# EAGLE board PCB (EAGLE 9.7.0)
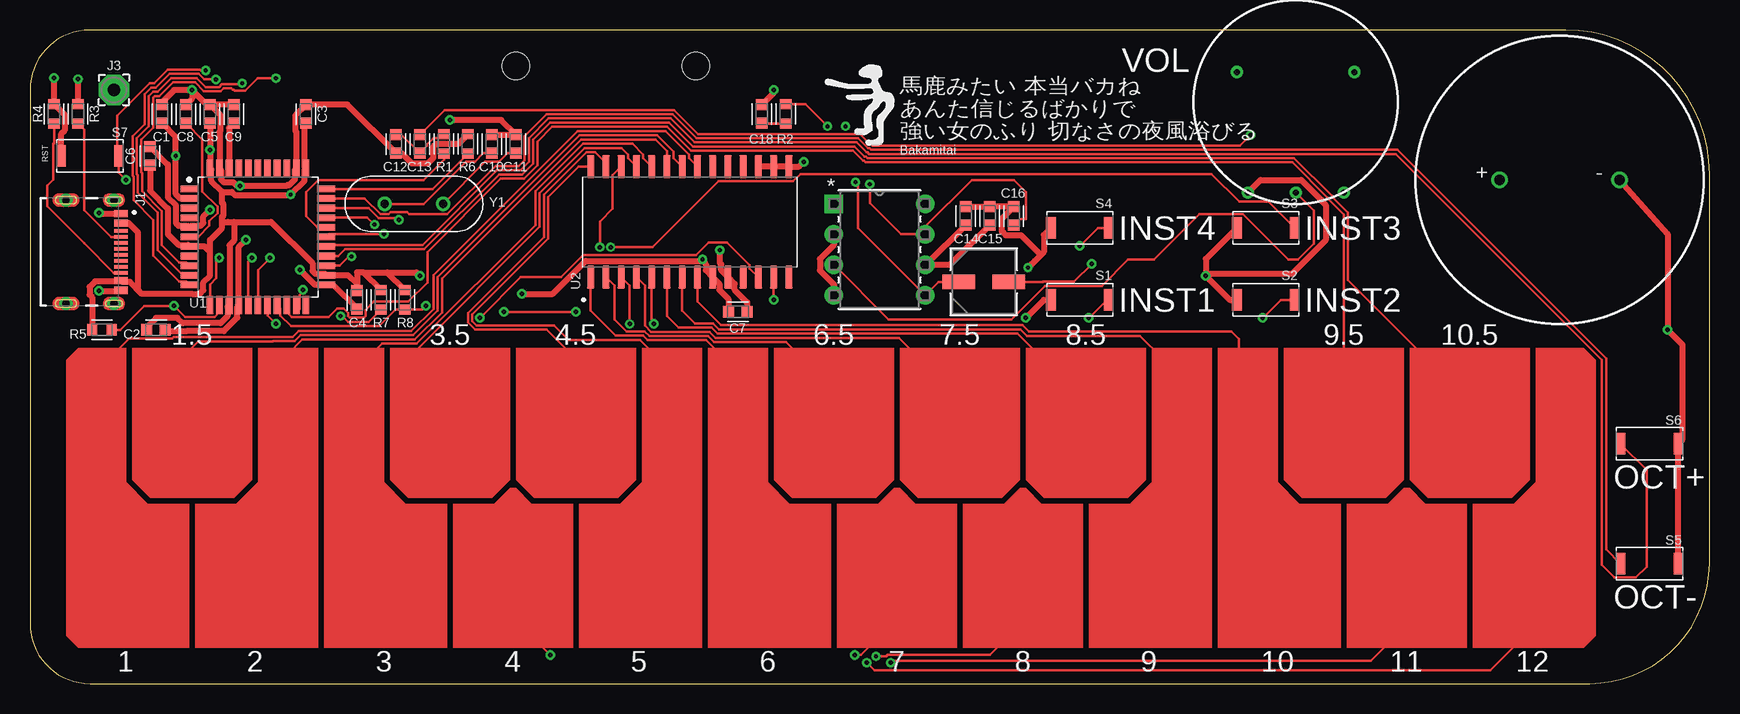
[diagram p0: board, top side]
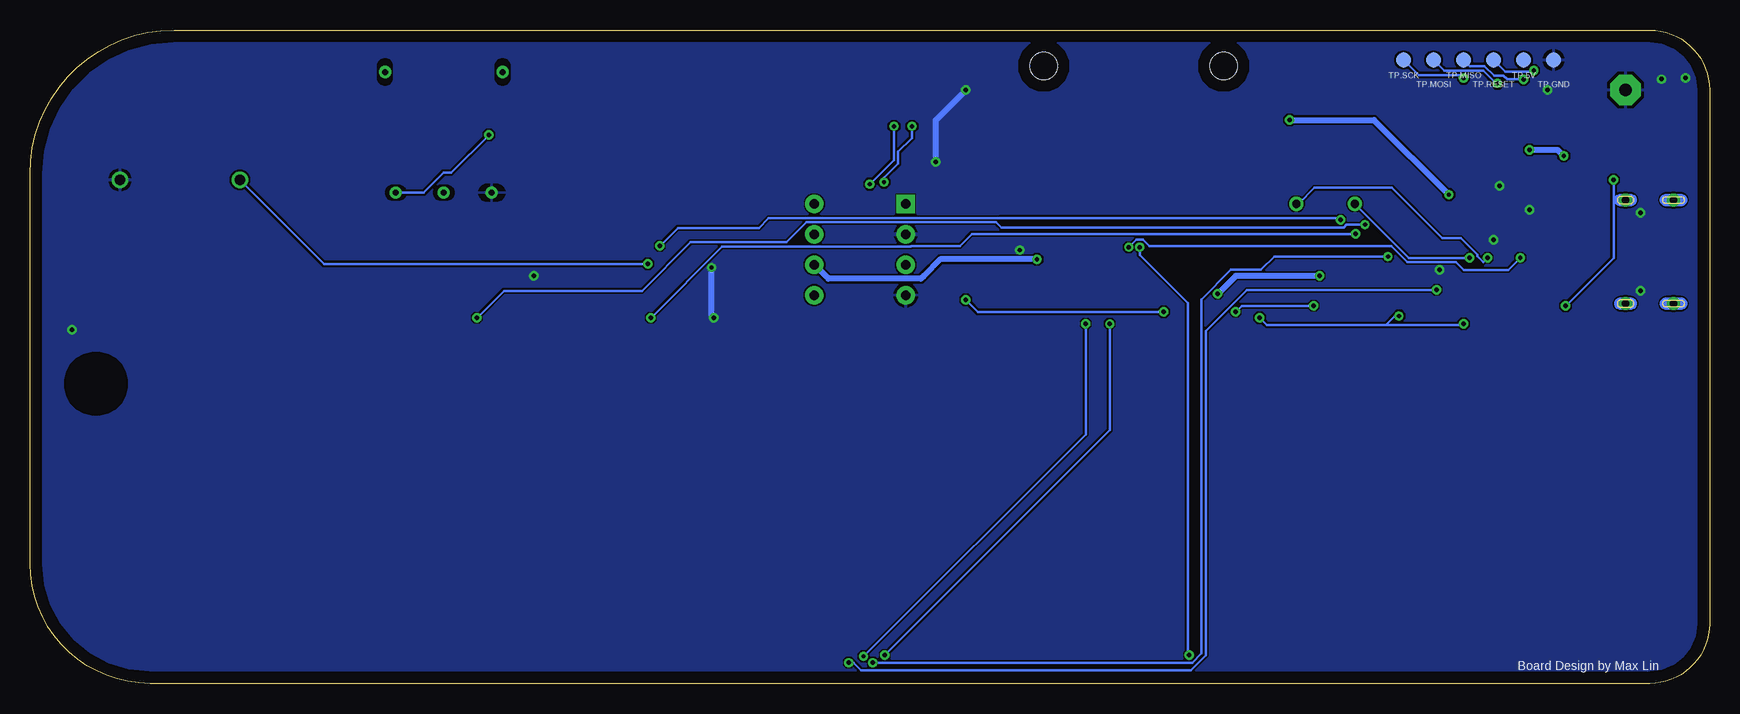
[diagram p1: board, bottom side, seen from below]

Size 140 x 54.5 mm. Coordinates in mm from the lower left corner, seen from the top.
Outline: 128,54.5 5,54.5 arc90 0,49.5 0,5 arc90 5,0 130,0 arc90 140,10 140,42.5 arc90 128,54.5
Copper layers (1*16): Top / Bottom
Stack-up Default Layer Stack: Top SilkScreen Epoxy Ink / Top SolderMask SR:Green 0.0254mm Dk 4.3 / Top Surface Finish Lead-Free 0.02mm / Top CuFoil:007 0.035mm / Dielectric-1 User Defined 1.5mm / Bottom CuFoil:007 0.035mm / Bottom Surface Finish Lead-Free 0.02mm / Bottom SolderMask SR:Green 0.0254mm Dk 4.3 / Bottom SilkScreen Epoxy Ink
Design rules: minimum copper width 6mil, minimum drill size 0.35mm, copper clearance wire_polygon to wire_polygon 6mil, copper clearance wire_polygon to pad_smd 6mil, copper clearance wire_polygon to via 6mil, copper clearance pad_smd to pad_smd 6mil, copper clearance pad_smd to via 6mil, copper clearance via to via 6mil, copper clearance smd to pad (same net) 6mil, copper clearance smd to via (same net) 6mil, copper clearance smd to smd (same net) 6mil, dimension clearance 40mil, via restrict clearance 0mil, restrict clearance 0mil, drill distance 6mil, keepout clearance 0mil
Holes 2.25 mm at 40.5,51.5 55.5,51.5

## Footprints (pad centres in the part's own frame; a part is rotated, then mirrored left to right if it is on the bottom)
CAPC1608X85 = smd 0.921 x 0.97: 1 -0.775,0; 2 0.775,0
CAP_UCD_5X5P8_NCH = smd 2.718 x 1.219: 1 -2.095,0; 2 2.095,0
GCT_USB4215-03-A_REVA = smd 0.6 x 1.15: A1_B12 -3.2,4.575; A4_B9 -2.4,4.575; B1_A12 3.2,4.575; B4_A9 2.4,4.575 | smd 0.3 x 1.15: A5 -1.25,4.575; A6 -0.25,4.575; A7 0.25,4.575; A8 1.25,4.575; B5 1.75,4.575; B6 0.75,4.575; B7 -0.75,4.575; B8 -1.75,4.575 | drill 0.6 pad 1: SH1 -4.32,4; SH2 4.32,4; SH3 -4.32,0; SH4 4.32,0
2.54/1.0 = drill 1.016 pad 2.54 octagon: 1 0,0
RESC1608X60 = smd 0.799 x 0.974: 1 -0.815,0; 2 0.815,0
B3U-1000P(M) = smd 0.8 x 1.8: 1 -2.4,0; 2 2.42,0
TP127R = smd 1.27 x 1.27: TP 0,0
QFP80P1200X1200X120-44 = smd 1.5 x 0.55: 1 -5.7,4; 2 -5.7,3.2; 3 -5.7,2.4; 4 -5.7,1.6; 5 -5.7,0.8; 6 -5.7,0; 7 -5.7,-0.8; 8 -5.7,-1.6; 9 -5.7,-2.4; 10 -5.7,-3.2; 11 -5.7,-4; 23 5.7,-4; 24 5.7,-3.2; 25 5.7,-2.4; 26 5.7,-1.6; 27 5.7,-0.8; 28 5.7,0; 29 5.7,0.8; 30 5.7,1.6; 31 5.7,2.4; 32 5.7,3.2; 33 5.7,4 | smd 0.55 x 1.5: 12 -4,-5.7; 13 -3.2,-5.7; 14 -2.4,-5.7; 15 -1.6,-5.7; 16 -0.8,-5.7; 17 0,-5.7; 18 0.8,-5.7; 19 1.6,-5.7; 20 2.4,-5.7; 21 3.2,-5.7; 22 4,-5.7; 34 4,5.7; 35 3.2,5.7; 36 2.4,5.7; 37 1.6,5.7; 38 0.8,5.7; 39 0,5.7; 40 -0.8,5.7; 41 -1.6,5.7; 42 -2.4,5.7; 43 -3.2,5.7; 44 -4,5.7
SOIC127P1030X265-28N = smd 1.9 x 0.6: 1 -4.605,8.255; 2 -4.605,6.985; 3 -4.605,5.715; 4 -4.605,4.445; 5 -4.605,3.175; 6 -4.605,1.905; 7 -4.605,0.635; 8 -4.605,-0.635; 9 -4.605,-1.905; 10 -4.605,-3.175; 11 -4.605,-4.445; 12 -4.605,-5.715; 13 -4.605,-6.985; 14 -4.605,-8.255; 15 4.605,-8.255; 16 4.605,-6.985; 17 4.605,-5.715; 18 4.605,-4.445; 19 4.605,-3.175; 20 4.605,-1.905; 21 4.605,-0.635; 22 4.605,0.635; 23 4.605,1.905; 24 4.605,3.175; 25 4.605,4.445; 26 4.605,5.715; 27 4.605,6.985; 28 4.605,8.255
N08E_TEX = drill 0.813 pad 1.524 square: 1 0,0 | drill 0.813 pad 1.524: 2 0,-2.54; 3 0,-5.08; 4 0,-7.62; 5 7.62,-7.62; 6 7.62,-5.08; 7 7.62,-2.54; 8 7.62,0
STYLOPHONEPCB = smd 0 x 0: P$1 5.375,3; P$2 10.5,20; P$3 16.125,3; P$4 26.875,3; P$5 32,20; P$6 37.625,3; P$7 42.5,20; P$8 48.375,3; P$9 59.125,3; P$10 64.5,20; P$11 69.875,3; P$12 74.5,20; P$13 80.625,3; P$14 85.5,20; P$15 91.375,3; P$16 102.125,3; P$17 106.5,20; P$18 112.875,3; P$19 123.625,3; P$20 117.5,20
2307 = drill 0.9: P$1 -5,0; P$2 5,0
POT3 = drill 0.5 slot 1.27: P$1 -4,-7.57 | drill 0.5 slot 1: P$2 0,-7.57; P$3 4,-7.57 | drill 0.5 slot 1.5 rotated 90: P$4 4.9,2.5; P$5 -4.9,2.5
XTAL_HC49P488W43L1150T466H350 = drill 0.68 pad 1.08: 1 -2.44,0; 2 2.44,0

## Placement (x,y rotation side)
C1  100n  [CAPC1608X85]  11,47.5 90 top
C2  100n  [CAPC1608X85]  10.5,29.5 0 top
C3  100n  [CAPC1608X85]  23,47.5 90 top
C4  100n  [CAPC1608X85]  27.25,32 270 top
C5  100n  [CAPC1608X85]  15,47.5 90 top
C6  10u  [CAPC1608X85]  10,44 90 top
C7  100n  [CAPC1608X85]  59,31 0 top
C8  1u  [CAPC1608X85]  13,47.5 90 top
C9  100n  [CAPC1608X85]  17,47.5 90 top
C10  22p  [CAPC1608X85]  38.5,45 90 top
C11  22p  [CAPC1608X85]  40.5,45 90 top
C12  10n  [CAPC1608X85]  30.5,45 90 top
C13  10u  [CAPC1608X85]  32.5,45 90 top
C14  100n  [CAPC1608X85]  78,39 270 top
C15  100u  [CAPC1608X85]  80,39 270 top
C16  10u  [CAPC1608X85]  82,39 90 top
C17  UCM0J221MCL1GSCAP_UCD_5X5P8_NCH  [CAP_UCD_5X5P8_NCH]  79.5,33.5 0 top
C18  47n  [CAPC1608X85]  61,47.5 90 top
J1  USB4215-03-A_REVAUSB4115-03-C_REVA  [GCT_USB4215-03-A_REVA]  3,36 270 top
J3  PAD  [2.54/1.0]  7,49.5 0 top
R1  1k  [RESC1608X60]  34.5,45 270 top
R2  10ohm  [RESC1608X60]  63,47.5 90 top
R3  5.1k  [RESC1608X60]  4,47.5 90 top
R4  5.1k  [RESC1608X60]  2,47.5 270 top
R5  10k  [RESC1608X60]  6,29.5 0 top
R6  10k  [RESC1608X60]  36.5,45 90 top
R7  4.7k  [RESC1608X60]  29.25,32 270 top
R8  4.7k  [RESC1608X60]  31.25,32 270 top
S1  B3U-X000B3U-1000P(M)1000P(M)  [B3U-1000P(M)]  87.5,32 0 top
S2  B3U-X000B3U-1000P(M)1000P(M)  [B3U-1000P(M)]  103,32 0 top
S3  B3U-X000B3U-1000P(M)1000P(M)  [B3U-1000P(M)]  103,38 0 top
S4  B3U-X000B3U-1000P(M)1000P(M)  [B3U-1000P(M)]  87.5,38 0 top
S5  B3U-X000B3U-1000P(M)1000P(M)  [B3U-1000P(M)]  135,10 180 top
S6  B3U-X000B3U-1000P(M)1000P(M)  [B3U-1000P(M)]  135,20 180 top
S7  B3U-X000B3U-1000P(M)1000P(M)  [B3U-1000P(M)]  5,44 180 top
TP.5V  TPTP127R  [TP127R]  15.5,52 180 bottom
TP.GND  TPTP127R  [TP127R]  13,52 180 bottom
TP.MISO  TPTP127R  [TP127R]  20.5,52 180 bottom
TP.MOSI  TPTP127R  [TP127R]  23,52 180 bottom
TP.RESET  TPTP127R  [TP127R]  18,52 180 bottom
TP.SCK  TPTP127R  [TP127R]  25.5,52 180 bottom
U1  ATMEGA32U4-AU  [QFP80P1200X1200X120-44]  19,37.25 0 top
U2  MCP23017-E/SO  [SOIC127P1030X265-28N]  55,38.5 90 top
U3  LM386N-1/NOPBN08E_TEX  [N08E_TEX]  67,40 0 top
U$1  STYLOPHONEPAD  [STYLOPHONEPCB]  3,3 0 top
U$2  23072307  [2307]  127.5,42 0 top
U$3  POT3POT3  [POT3]  105.51,48.5 0 top
Y1  HC-49/U-S16000000ABJB  [XTAL_HC49P488W43L1150T466H350]  32,40 0 top

## Library data of the parts
C1-C16 C18 = Capacitor; CATEGORY: Capacitor; PACKAGE_SIZE: 0603; PACKAGE_TYPE: Surface Mount; SUBCATEGORY: Ceramic Capacitors; TYPE: MLCC
C17 = 2026-10-24_01-56-39_Library; COPYRIGHT: Copyright (C) 2026 Ultra Librarian. All rights reserved.; MANUFACTURER_NAME: Nichicon; MANUFACTURER_PART_NUMBER: UCM0J221MCL1GS
J1 = USB4215-03-A_REVA; CREATOR: Amina; MANUFACTURER: Global Connector Technology; MAXIMUM_PACKAGE_HEIGHT: 3.16mm; PARTREV: A; STANDARD: Manufacturer Recommendations; VERIFIER: Your name, use the same always
J3 = Connector; CATEGORY: Connectors; DESCRIPTION: Pad with 2.54 mm diamater and 1mm drill; PACKAGE_SIZE: NA; PACKAGE_TYPE: Through Hole; PITCH: NA
R1-R8 = Resistor; CATEGORY: Resistors; DESCRIPTION: Chip Resistor 1.60 X 0.82 X 0.60 mm body 0603(1608-METRIC) Package; PACKAGE_SIZE: 0603; PACKAGE_TYPE: Surface Mount
S1-S7 = Switch; CATEGORY: Switches; DATASHEET: https://omronfs.omron.com/en_US/ecb/products/pdf/en-b3u.pdf; DESCRIPTION: Tactile Switch SPST-NO Top Actuated Surface Mount; MANUFACTURER: Omron Electronics Inc-EMC Div; MPN: B3U-1000PM; OPERATING_TEMPERATURE: -25°C ~ 70°C; PACKAGE_SIZE: NA; PACKAGE_TYPE: SMD; PART_STATUS: ACTIVE; ROHS: COMPLIANT; SERIES: B3U; SUBCATEGORY: Tactile Switches; TYPE: SPST-NO
TP.5V TP.GND TP.MISO TP.MOSI TP.RESET TP.SCK = PCB_Utilities; CATEGORY_L1: Test Points; DESCRIPTION: Test Point Round 1.27mmx1.27mm
U1 = IC_Embedded; CATEGORY: Embedded ICs; CORE: AVR; DATASHEET: https://ww1.microchip.com/downloads/en/DeviceDoc/Atmel-7766-8-bit-AVR-ATmega16U4-32U4_Datasheet.pdf; DESCRIPTION: AVR AVR® ATmega Microcontroller IC 8-Bit 16MHz 32KB (16K x 16) FLASH 44-TQFP (10x10); IO: 26; MANUFACTURER: Microchip Technology; MPN: ATmega32U4-AU; OPERATING_TEMPERATURE: -40°C ~ 85°C; PACKAGE_SIZE: 44-TQFP; PACKAGE_TYPE: Surface Mount; PART_STATUS: Active; ROHS: Compliant; SERIES: AVR® ATmega; SPEED: 16MHz; SUBCATEGORY: Microcontrollers; TYPE: 8-Bit
U2 = MCP23017-E_SO; AVAILABILITY: In Stock; CHECK_PRICES: https://www.snapeda.com/parts/MCP23017-E/SO/Microchip+Technology/view-part/?ref=eda; DESCRIPTION: I/O Port Expander, 16-Bit, I2C I'face, SOIC-28 | Microchip Technology Inc. MCP23017-E/SO; MF: Microchip; MP: MCP23017-E/SO; PACKAGE: SOIC-28 Microchip; PRICE: None; SNAPEDA_LINK: https://www.snapeda.com/parts/MCP23017-E/SO/Microchip+Technology/view-part/?ref=snap
U3 = 2026-10-22_22-21-42_Library; COPYRIGHT: Copyright (C) 2026 Ultra Librarian. All rights reserved.; DATASHEET: https://www.ti.com/lit/gpn/lm386; DESCRIPTION: 700-mW, mono, 5- to 18-V, analog input Class-AB audio amplifier 8-PDIP 0 to 70; MANUFACTURER_NAME: Texas Instruments; MANUFACTURER_PART_NUMBER: LM386N-1/NOPB
U$1 = Stylophone Pads
U$2 = 2307 Speaker
U$3 = POT3
Y1 = HC-49_U-S16000000ABJB; AVAILABILITY: In Stock; CHECK_PRICES: https://www.snapeda.com/parts/HC-49/U-S16000000ABJB/Citizen/view-part/?ref=eda; DESCRIPTION: 16 MHz ±30ppm Crystal 18pF 50 Ohms HC-49/US; MF: Citizen Finedevice; MP: HC-49/U-S16000000ABJB; PACKAGE: HC-49/US Citizen Finetech Miyota; PRICE: None; SNAPEDA_LINK: https://www.snapeda.com/parts/HC-49/U-S16000000ABJB/Citizen/view-part/?ref=snap

## Nets
5V: C1.1 C2.1 C3.1 C4.1 C5.1 C6.1 C7.1 C10.2 C11.2 C14.2 C15.2 J1.A4_B9 J1.B4_A9 R5.1 R7.1 R8.1 U1.2 U1.7 U1.14 U1.24 U1.34 U1.44 U2.9 U3.6
GND: C1.2 C2.2 C3.2 C4.2 C5.2 C6.2 C7.2 C8.2 C9.2 C12.1 C14.1 C15.1 C16.2 C18.2 J1.A1_B12 J1.B1_A12 J3.1 R3.2 R4.1 R6.2 S1.1 S2.1 S3.1 S4.1 S5.1 S6.1 S7.2 TP.GND.TP U1.5 U1.15 U1.23 U1.35 U1.43 U2.10 U2.15 U2.16 U2.17 U3.2 U3.4 U$2.P$2 U$3.P$1
N$1: R7.2 U1.18 U2.12
N$2: R8.2 U1.19 U2.13
N$3: U2.21 U$1.P$1
N$4: U2.22 U$1.P$2
N$5: U2.23 U$1.P$3
N$6: U2.24 U$1.P$4
N$7: U2.25 U$1.P$5
N$8: U2.26 U$1.P$6
N$9: U2.27 U$1.P$7
N$10: U2.28 U$1.P$8
N$11: U2.1 U$1.P$9
N$12: U2.2 U$1.P$10
N$13: U2.3 U$1.P$11
N$14: U2.4 U$1.P$12
N$15: U2.5 U$1.P$13
N$16: U2.6 U$1.P$14
N$17: U2.7 U$1.P$15
N$18: U2.8 U$1.P$16
N$19: U1.20 U$1.P$17
N$20: U1.21 U$1.P$18
N$21: U1.25 U$1.P$19
N$22: U1.26 U$1.P$20
N$23: S1.2 U1.28
N$24: S2.2 U1.30
N$25: S3.2 U1.12
N$26: S4.2 U1.31
N$27: S5.2 U1.32
N$28: S6.2 U1.27
N$29: C18.1 R2.1
N$30: R1.2 U1.29
N$31: C12.2 C13.1 R1.1
N$32: C13.2 U$3.P$3
N$33: U3.3 U$3.P$2
N$34: C16.1 U3.7
N$35: C9.1 U1.42
N$37: C11.1 U1.16 Y1.2
N$38: C17.1 R2.2 U3.5
N$39: J1.B5 R4.2
N$40: J1.A5 R3.1
N$41: C8.1 U1.6
N$42: R6.1 U1.33
N$43: TP.SCK.TP U1.9
N$44: TP.MOSI.TP U1.10
N$45: TP.MISO.TP U1.11
N$46: R5.2 S7.1 TP.RESET.TP U1.13
N$47: C10.1 U1.17 Y1.1
N$48: C17.2 U$2.P$1

## Tracks (layer width: path | path; a pad name or v marks a point on that pad's centre or on a via)
5V  (via drill 0.35)
  Top 0.5: R5.1 5.18,32.21 4.97,32.43 4.97,33.07 5.43,33.53 7.51,33.53 J1.B4_A9 7.67,33.5 8.32,33.5 9.32,32.5 | C3.1 22.88,46.6 22.88,43.07 U1.34 22.88,42.83 22.88,41.91 v21.73,40.77 21.69,40.72 17.11,40.72 16.83,41 16,41 | 27.25,33.29 27.25,34.29 27.77,34.29 27.78,34.28 | 27.25,33.29 C4.1 | 27.78,34.28 R7.1 | 27.78,34.28 29.78,34.28 | R8.1 29.78,34.28 | C5.1 v15,44.5 U1.44 15.12,42.83 15.12,41.91 16,41.03 16,41 | C7.1 58.23,32.07 57.47,32.82 57.47,33.33 U2.9 56.34,34.46 56.34,34.97 56.06,35.25 | 74.69,34.92 C14.2 | U3.6 74.69,34.92 | 74.69,34.92 75.19,34.92 76.69,34.92 77.19,35.42 C15.2 | C2.1 9.72,29.73 10.5,30.5 12.29,30.5 12.74,30.05 15.89,30.05 16.48,30.63 16.48,31.43 U1.14 16.62,31.57 16.62,36.55 17,36.92 17,38.5 | 27.25,33.29 26.49,34.05 U1.24 24.58,34.17 23.78,34.17 23.55,34.41 23.55,35.06 20.1,38.5 17,38.5 | C6.1 10,41.11 11.49,39.62 11.49,37.46 12.38,36.57 13.18,36.57 U1.7 14.55,36.45 15,36 | C1.1 12.15,45.58 12.15,45.5 v12.15,44 12.15,40.81 12.51,40.45 U1.2 | 9.32,32.5 13.5,32.5 14.14,32.5 14.45,32.81 14.45,33.45 15,34 15,36 | 15,36 15,37 16,38 16,38.5 | 16,38.5 16.5,38.5 17,38.5 | 16,38.5 16,38.9 16.13,39.03 16.13,39.97 16,40.1 16,41 | 29.78,34.28 32.22,34.28 v32.5,34 | 56.06,35.25 46.32,35.25 43.58,32.5 v41,32.5 | 56.06,35.25 v56.06,35.38 56.06,35.25 | C10.2 C11.2 39.27,47 v35,47 | 9.32,32.5 9,32.82 9,37 9,37.62 8.22,38.4 J1.A4_B9
  Bottom 0.5: v32.5,34 39.5,34 v41,32.5 | v56.06,35.38 64.12,35.38 65.5,34 65.74,33.76 73.46,33.76 U3.6 | v35,47 27.97,47 v21.73,40.77 | v12.15,44 12.65,44.5 v15,44.5
GND  (via drill 0.35)
  Top 0.5: J1.B1_A12 7.53,32.75 v5.75,32.75 | J1.A1_B12 5.8,39.2 v5.75,39.25 | v2,50.5 R4.1 2.89,47.43 2.89,46.12 2.58,45.81 S7.2 | S5.1 S6.1 137.77,20.37 137.77,28.23 v136.5,29.5 136.5,37.5 U$2.P$2 | C18.2 62,49.27 v62,49.5 | 66.54,37.46 U3.2 67,36.57 65.84,35.4 65.84,34.44 67,33.27 U3.4 | R3.2 v4,50.41 | v13.5,49.5 12,49.5 11,48.5 C1.2 | C4.2 27.25,31.26 25.26,33.25 U1.23 23.75,33.25 v22.5,34.5 | C5.2 15.89,47.39 15.89,46.1 15.8,46.01 U1.43 15.92,42.83 15.92,42.03 16.16,41.8 16.95,41.8 17.25,41.5 v17.5,41.5 21.36,41.5 21.41,41.55 21.59,41.55 22.08,42.03 22.08,42.83 U1.35 22.2,46.01 22.11,46.1 22.11,47.39 C3.2 26.45,48.27 C12.1 30.98,44.23 31.85,43.36 33.15,43.36 33.61,43.82 33.61,44.75 33.85,44.99 34.38,44.99 34.4,45 34.5,45 35.69,45 R6.2 | C7.2 59.77,31.79 58.74,32.82 58.74,33.33 U2.10 57.61,34.46 57.61,34.97 57.5,35.08 v57.5,36.16 | C15.1 80,40 | v13.5,49.5 13.5,48.77 C8.2 | C5.2 14.72,48.27 v13.5,49.5 | C2.2 11.38,29.39 13.06,29.39 16.16,29.39 17.28,30.51 17.28,31.43 U1.15 17.4,36.4 v18,37 | C6.2 11.49,43.28 11.49,40.54 12.15,39.89 12.15,38.41 12.38,38.17 13.18,38.17 U1.5 13.42,38.17 14.22,38.17 14.45,38.41 14.45,38.95 v15,39.5 | S4.1 84.5,37.4 84.5,36 84.25,35.75 | 84.25,35.75 83.75,35.25 83.5,35 v83.18,34.68 | S1.1 84.5,32 v83,30.5 | S3.1 98,35.4 98,34.15 | 98,34.15 v98,34 100,32 S2.1 | U$3.P$1 102.58,42 105.97,42 107.65,40.32 107.65,40.26 108,39.91 108,36.96 105.19,34.15 98,34.15 | U2.17 U2.16 U2.15 64.11,43.1 v64.5,43.5 | C9.2 C5.2 | 84.25,35.75 82.64,37.36 81.35,37.36 81,37.71 81,38.77 C16.2 C15.1 | C14.1 C15.1
  Bottom 0.5: v64.5,43.5 64.5,47 v62,49.5 | v83,30.5 83.18,30.68 v83.18,34.68
  pour Bottom: 0,54.5 140,54.5 140,0 0,0
N$1  (via drill 0.35)
  Top 0.2: v20.5,30 19.8,30.7 U1.18 | v37.5,30.5 40.9,33.9 44.26,33.9 46.11,35.75 55.54,35.75 56.58,36.79 58.12,36.79 60,34.91 60,34.61 U2.12 | v25.88,30.65 26.03,30.65 26.51,30.16 28.23,30.16 R7.2
  Bottom 0.2: 27,29.88 20.62,29.88 v20.5,30 | v37.5,30.5 36.88,29.88 27,29.88 | 27,29.88 26.23,30.65 v25.88,30.65
N$2  (via drill 0.35)
  Top 0.2: U1.19 20.87,31.28 20.87,30.7 21.76,29.81 29.12,29.81 30.49,31.18 R8.2 32.69,31.18 v33,31.5 | v39.5,31 v45.5,31 | v62,32 61.98,32.02 U2.13
  Bottom 0.2: v33,31.5 39,31.5 v39.5,31 | v45.5,31 61,31 v62,32
N$3
  Top 0.2: U2.21 54.92,43.82 54.92,44.12 52.96,46.07 45.66,46.07 33.63,34.05 33.63,31.24 31.79,29.4 22.4,29.4 21.9,28.9 20.11,28.9 20.1,28.89 11.97,28.89 11.84,28.76 8.26,28.76 6.5,27
N$4
  Top 0.2: U2.22 53.65,43.82 53.65,44.35 52.28,45.72 45.8,45.72 33.98,33.9 33.98,31.09 31.93,29.05 22.55,29.05 22.05,28.55 20.25,28.55 20.25,28.54 14.04,28.54 12.5,27
N$5
  Top 0.2: U2.23 53.09,44.41 52.13,45.37 45.95,45.37 34.34,33.75 34.34,30.95 32.08,28.69 22.69,28.69 21.5,27.5
N$6
  Top 0.2: U$1.P$4 27.38,8.5 27.38,26.38 29.34,28.34 32.23,28.34 42.13,38.25 42.13,41.05 46.09,45.01 50.21,45.01 51.11,44.12 51.11,43.82 U2.24
N$7
  Top 0.2: U$1.P$5 33.4,23 32,24.4 32,27.61 42.49,38.1 42.49,40.91 46.24,44.66 49.29,44.66 49.84,44.12 49.84,43.82 U2.25
N$8  (via drill 0.35)
  Top 0.2: U$1.P$6 40.25,6.38 40.25,5.5 v43.38,2.38 | U2.26 48.57,42.39 48.57,39.59 47.5,38.53 v47.5,36.38
  Bottom 0.2: v43.38,2.38 43.5,2.5 43.5,31.75 47.5,35.75 v47.5,36.38
N$9
  Top 0.2: U$1.P$7 45.5,27.08 43.06,29.52 37.09,29.52 36.52,30.09 36.52,30.91 42.84,37.23 42.84,40.76 46.38,44.31 47.11,44.31 48.02,43.4 U2.27
N$10
  Top 0.2: 43.19,38 43.19,38.05 | 52.75,26.75 50.84,28.66 44.92,28.66 43.71,29.87 37.24,29.87 36.87,30.24 36.87,30.76 43.19,37.08 43.19,38 | U2.28 45.74,43.1 43.19,40.55 43.19,38
N$11
  Top 0.2: U2.1 46.74,31.1 48.83,29.01 51.1,29.01 51.49,28.63 56.37,28.63 57.5,27.5
N$12
  Top 0.2: U2.2 48.73,33.18 48.73,30.37 49.74,29.37 51.24,29.37 51.63,28.98 56.52,28.98 57.02,28.48 63.02,28.48 65,26.5
N$13  (via drill 0.35)
  Top 0.2: v50,30 50,33.18 U2.3 | v68.75,2.38 69.25,2.38 U$1.P$11
  Bottom 0.2: v50,30 v50,29.99 50,21.13 v68.75,2.38
N$14
  Top 0.2: U2.4 51.27,33.18 51.27,29.84 51.78,29.33 56.67,29.33 57.17,28.83 72.42,28.83 77.5,23.75
N$15  (via drill 0.35)
  Top 0.2: v52,30 51.83,30.18 U2.5 | v70.52,2.27 71.38,2.27 71.49,2.38 80,2.38 U$1.P$13
  Bottom 0.2: v52,30 52,20.78 v70.52,2.27
N$16
  Top 0.2: U2.6 53.09,30.66 54.07,29.68 56.81,29.68 57.31,29.18 82.32,29.18 U$1.P$14
N$17
  Top 0.2: U2.7 54.37,31.1 55.43,30.04 56.96,30.04 57.46,29.54 82.57,29.54 83.11,29 92.52,29 94.38,27.14 U$1.P$15
N$18
  Top 0.2: U$1.P$16 100.75,10.38 100.75,28.75 100.15,29.35 83.26,29.35 82.72,29.89 57.6,29.89 55.63,31.86 U2.8
N$19
  Top 0.2: U1.20 21.4,30.97 21.82,30.55 24.89,30.55 25.62,31.28 26.14,31.28 26.51,30.91 26.51,30.66 26.66,30.51 27.84,30.51 27.99,30.66 27.99,31.17 28.66,31.84 31.52,31.84 33.13,33.45 33.13,36 39.23,42.1 41.17,42.1 42.3,43.22 42.3,45.21 43.51,46.42 53.11,46.42 55.11,44.42 68.6,44.42 69.43,43.59 69.53,43.59 69.66,43.46 105.22,43.46 108.15,40.53 108.15,40.47 109.5,39.12 U$1.P$17
N$20  (via drill 0.35)
  Top 0.2: v71.75,1.75 71.92,1.91 111.79,1.91 U$1.P$18 | U1.21 22.2,30.97 22.47,31.24 22.47,32.41 22.75,32.68 v22.75,32.83
  Bottom 0.2: v71.75,1.75 71.37,1.75 70.73,1.12 43.24,1.12 42,2.36 42,29.39 38.56,32.83 v22.75,32.83
N$21  (via drill 0.35)
  Top 0.2: U$1.P$19 121.74,1.12 70.38,1.12 v69.75,1.75 | U1.25 25.8,34.85 26.55,35.6 v26.8,35.6
  Bottom 0.2: v69.75,1.75 43.64,1.75 43.64,1.74 43.11,1.74 42.35,2.51 42.35,32.04 39.89,34.5 37.39,34.5 36.29,35.6 v26.8,35.6
N$22
  Top 0.2: U$1.P$20 109.85,33.65 109.85,39.27 108.5,40.62 108.5,40.68 105.37,43.81 69.8,43.81 69.67,43.94 69.58,43.94 68.75,44.77 55.26,44.77 53.26,46.77 43.36,46.77 41.94,45.35 41.94,43.37 41.03,42.45 39.09,42.45 32.86,36.23 26.28,36.23 25.7,35.65 U1.26
N$23  (via drill 0.35)
  Top 0.2: U1.28 24.95,37.5 v29.5,37.5 | S1.2 89.75,32 v88.25,30.5
  Bottom 0.2: v29.5,37.5 61.5,37.5 62.5,36.5 66.53,36.5 66.58,36.45 82.3,36.45 v88.25,30.5
N$24  (via drill 0.35)
  Top 0.2: U1.30 28.12,38.85 v28.71,38.26 | S2.2 104.25,32 v102.75,30.5
  Bottom 0.2: v28.71,38.26 30.26,38.26 30.49,38.03 59.03,38.03 59.47,38.47 75.28,38.47 76.95,36.8 84.95,36.8 89,32.75 100.5,32.75 v102.75,30.5
N$25  (via drill 0.35)
  Top 0.2: U1.12 15,33.29 15.5,33.79 15.5,35.22 v15.78,35.5 | v48.41,36.38 51.88,36.38 57.4,41.9 63.62,41.9 64.21,42.5 98.48,42.5 100.81,40.17 103.25,40.17 S3.2
  Bottom 0.2: v15.78,35.5 16.78,34.5 20.5,34.5 21.15,35.15 25.21,35.15 26.54,36.48 46.71,36.48 47.24,37.01 47.76,37.01 48.39,36.38 v48.41,36.38
N$26  (via drill 0.35)
  Top 0.2: U1.31 28.21,39.65 29.06,38.8 30.61,38.8 v30.75,38.66 | S4.2 89,38 v87.5,36.5
  Bottom 0.2: v30.75,38.66 30.89,38.8 59.3,38.8 59.33,38.83 78.42,38.83 79.25,38 86,38 v87.5,36.5
N$27
  Top 0.2: U1.32 27.91,40.45 29.21,39.15 29.91,39.15 30.05,39.3 31.45,39.3 31.59,39.15 34.79,39.15 38.8,43.16 40.74,43.16 41.24,43.66 41.24,45.65 43.07,47.48 53.55,47.48 55.55,45.48 69.04,45.48 69.87,44.65 69.97,44.65 70.09,44.52 113.98,44.52 131.38,27.12 131.38,11.2 S5.2
N$28
  Top 0.2: S6.2 134.75,17.83 134.75,9.75 133.85,8.85 132.07,8.85 131.03,9.89 131.03,26.97 113.83,44.16 69.95,44.16 69.82,44.29 69.72,44.29 68.89,45.13 55.4,45.13 53.4,47.13 43.22,47.13 41.59,45.5 41.59,43.51 40.88,42.81 38.94,42.81 32.72,36.58 24.83,36.58 U1.27
N$29
  Top 0.2: R2.1 61.04,46.69 C18.1
N$30
  Top 0.2: R1.2 34.5,43.69 32.81,42 24,42 23,41 23,39 23.95,38.05 U1.29
N$31
  Top 0.2: C12.2 30.95,45.77 C13.1 33.11,44.83 33.11,44.96 33.64,45.49 34.17,45.49 R1.1
N$32  (via drill 0.35)
  Top 0.2: v101.75,45.75 100.87,44.87 70.24,44.87 70.11,45 70.02,45 69.18,45.83 55.69,45.83 53.69,47.83 34.56,47.83 C13.2
  Bottom 0.2: v101.75,45.75 104.91,42.59 105.53,42.59 107.19,40.93 U$3.P$3
N$33
  Top 0.2: U$3.P$2 107,39.44 107,36.67 105.67,35.35 104.91,35.35 101.11,39.15 97.48,39.15 93.67,35.35 91.54,35.35 89.34,33.15 84.59,33.15 81.81,30.37 71.55,30.37 U3.3
N$34  (via drill 0.35)
  Top 0.2: v70,41.65 70,40.08 72.62,37.46 U3.7 74.62,38.12 78.5,42 82,42 83,41 83,38.73 82.5,38.73 C16.1
  Bottom 0.2: v70,41.65 68,43.65 68,46 67.98,46.02 v67.98,46.46
N$35
  Top 0.5: U1.42 16.6,46.33 C9.1
N$37  (via drill 0.35)
  Top 0.2: v18.5,35.5 18.2,35.2 U1.16 | Y1.2 37.95,43.51 39.09,43.51 39.8,44.23 C11.1
  Bottom 0.2: Y1.2 34.26,40 32.92,41.34 26.48,41.34 22.27,37.13 20.74,37.13 19.37,35.76 19.37,35.63 18.87,35.13 v18.5,35.5
N$38  (via drill 0.35)
  Top 0.2: v68.8,41.8 69,41.61 69,38 U3.5 75.74,33.5 C17.1 | R2.2 64.63,48.31 v66.48,46.46
  Bottom 0.2: v68.8,41.8 68.8,42.2 67.65,43.35 67.65,44.34 66.48,45.5 v66.48,46.46
N$39
  Top 0.2: J1.B5 6.99,34.25 4.5,36.74 4.5,36.75 1.43,39.82 1.43,41.51 1.93,42.01 1.93,45.01 2,45.08 R4.2
N$40
  Top 0.2: R3.1 4.5,46.19 4.5,39.5 6.75,37.25 J1.A5
N$41
  Top 0.2: U1.6 14.01,37.25 14.96,38.2 14.96,38.56 15.63,39.24 15.63,39.76 14.37,41.02 14.37,45.36 C8.1
N$42
  Top 0.2: R6.1 33.56,41.25 U1.33
N$43  (via drill 0.35)
  Top 0.2: v20.5,50.48 19,50.48 17.94,49.42 17.06,49.42 16.98,49.5 16.89,49.5 16.76,49.63 16.14,49.63 15.91,49.39 14.5,49.39 13.76,50.13 11.92,50.13 10.78,48.99 10.41,48.99 10.26,48.84 10.26,46.34 9.26,45.34 9.26,42.63 9.34,42.55 9.34,41.06 10.99,39.41 10.99,36.58 12.45,35.12 13.03,35.12 U1.9
  Bottom 0.2: TP.SCK.TP 24.25,50.75 20.77,50.75 v20.5,50.48
N$44  (via drill 0.35)
  Top 0.2: v17.68,50.05 17.61,49.98 16,49.98 15.76,49.74 14.64,49.74 13.91,50.48 11.77,50.48 10.63,49.34 10.26,49.34 9.91,48.99 9.91,46.49 8.91,45.49 8.91,42.48 8.98,42.41 8.98,40.92 10.64,39.26 10.64,36.13 12.72,34.05 U1.10
  Bottom 0.2: TP.MOSI.TP 22.11,51.11 18.87,51.11 17.81,50.05 v17.68,50.05
N$45  (via drill 0.35)
  Top 0.2: v15.5,50.38 14.51,50.38 14.05,50.84 11.63,50.84 10.48,49.69 10.12,49.69 9.56,49.13 9.56,46.63 8.56,45.63 8.56,42.33 8.63,42.26 8.63,40.3 10.29,38.64 10.29,35.68 12.45,33.52 13.03,33.52 U1.11
  Bottom 0.2: TP.MISO.TP 20,51.5 18.75,51.5 17.94,50.69 17.18,50.69 16.87,50.38 v15.5,50.38
N$46  (via drill 0.35)
  Top 0.2: R5.2 7.5,29.5 9.5,31.5 v12,31.5 12.95,30.55 15.38,30.55 15.8,30.97 U1.13 | v14.66,51.12 14.26,51.12 14.2,51.19 11.48,51.19 10.34,50.05 9.97,50.05 7.26,47.34 7.26,44.14 S7.1 7.4,42.6 v8,42
  Bottom 0.2: TP.RESET.TP 17.01,51.01 14.77,51.01 v14.66,51.12 | v12,31.5 8,35.5 v8,42
N$47  (via drill 0.35)
  Top 0.2: v20,35.5 19,34.5 U1.17 | C10.1 37.78,44.23 37.09,43.53 36.35,43.53 32.81,40 Y1.1
  Bottom 0.2: Y1.1 25.06,35.5 v20,35.5
N$48  (via drill 0.35)
  Top 0.2: C17.2 84.44,33.5 84.45,33.51 87,33.51 v88.5,35
  Bottom 0.2: U$2.P$1 115.5,35 v88.5,35

## Text on the board
SilkscreenTop: VOL | 馬鹿みたい 本当バカね / あんた信じるばかりで / 強い女のふり 切なさの夜風浴びる | RST | Bakamitai | INST4 | INST3 | INST1 | INST2 | 1.5 | 3.5 | 4.5 | 6.5 | 7.5 | 8.5 | 9.5 | 10.5 | OCT+ | OCT- | 1 | 2 | 3 | 4 | 5 | 6 | 7 | 8 | 9 | 10 | 11 | 12
SilkscreenBottom: Board Design by Max Lin